# Altium PCB LM27762DSSR.pcbdoc
Units mil, origin at the board's own origin, x right, y up, seen from the top; angles counter-clockwise.
Board outline 635.93 x 615 mil, 2 copper layers (Top Layer, Bottom Layer), stack 0 mil thick; 1 components, 0 nets, 13 pads, 0 vias.
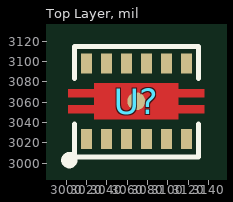
[diagram p0: Top Layer view]
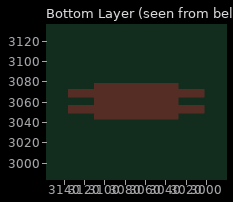
[diagram p1: Bottom Layer view, seen from below]

## Layer stack, top to bottom
Top Layer: signal copper (thickness not stored)
Bottom Layer: signal copper (thickness not stored)

## Board outline
3385.93,2750 2750,2750 2750,3365 3385.93,3365

## Design rules (kind name [scope] priority, off if disabled: settings)
PasteMaskExpansion "Paste Mask Expansion" [All] p1: expansion=0
SolderMaskExpansion "Solder Mask Expansion" [IsVia] p1: expansion=-1000 istentingtop=TRUE
SolderMaskExpansion "Solder Mask Expansion" [All] p2: expansion=2 istentingtop=FALSE

## Components (designator, comment, footprint, x,y, rotation, side; value= is the part's Value field where it differs from the comment)
U? "LM27762DSSR" WSON-12_L3.0-W2.0-P0.50-BL-EP 3069,3061 r0 top

## Footprints (in the part's own frame and the unit in brackets; to place one, negate y for a bottom-side part, rotate by r counter-clockwise, add the part's x,y. Pads: shape width x height; smd on the part's side, far side on the other; paste and mask are expansions set on the pad)
WSON-12_L3.0-W2.0-P0.50-BL-EP [mil]
  rect 11x19.7 smd: 1(-49.21,-37) 2(-29.53,-37) 3(-9.84,-37) 4(9.84,-37) 5(29.53,-37) 6(49.21,-37) 7(49.21,37) 8(29.53,37) 9(9.84,37) 10(-9.84,37) 11(-29.53,37) 12(-49.21,37)
  round 17.72 smd: 13(0,0)
  Top Layer region: -41.34,17.72 -41.34,11.81 -66.93,11.81 -66.93,3.94 -41.34,3.94 -41.34,-3.94 -66.93,-3.94 -66.93,-11.81 -41.34,-11.81 -41.34,-17.72 41.34,-17.72 41.34,-11.81 66.93,-11.81 66.93,-3.94 41.34,-3.94 41.34,3.94 66.93,3.94 66.93,11.81 41.34,11.81 41.34,17.72
  silkscreen extent -69,-61 61,54

## Nets (pads, with @x,y where several pads share a name; then routed paths per layer and width w, separated by ;. In a path a pad name is that pad's centre, name@x,y a point inside that pad or via, vN(x,y) a via of type N, cw(c..) or ccw(c..) an arc to the next point about the centre after c; other vN are vias at no path point)
pads on no net: U?.1 U?.2 U?.3 U?.4 U?.5 U?.6 U?.7 U?.8 U?.9 U?.10 U?.11 U?.12 U?.13